# Altium PCB PCB_Control_Unit_2027.PcbDoc
Units mil, origin at the board's own origin, x right, y up, seen from the top; angles counter-clockwise.
Board outline 6000 x 6985 mil, 2 copper layers (Top Layer, Bottom Layer); 48 components, 53 nets, 325 pads, 0 vias.
Unrouted connection lines stored in the file: 91.
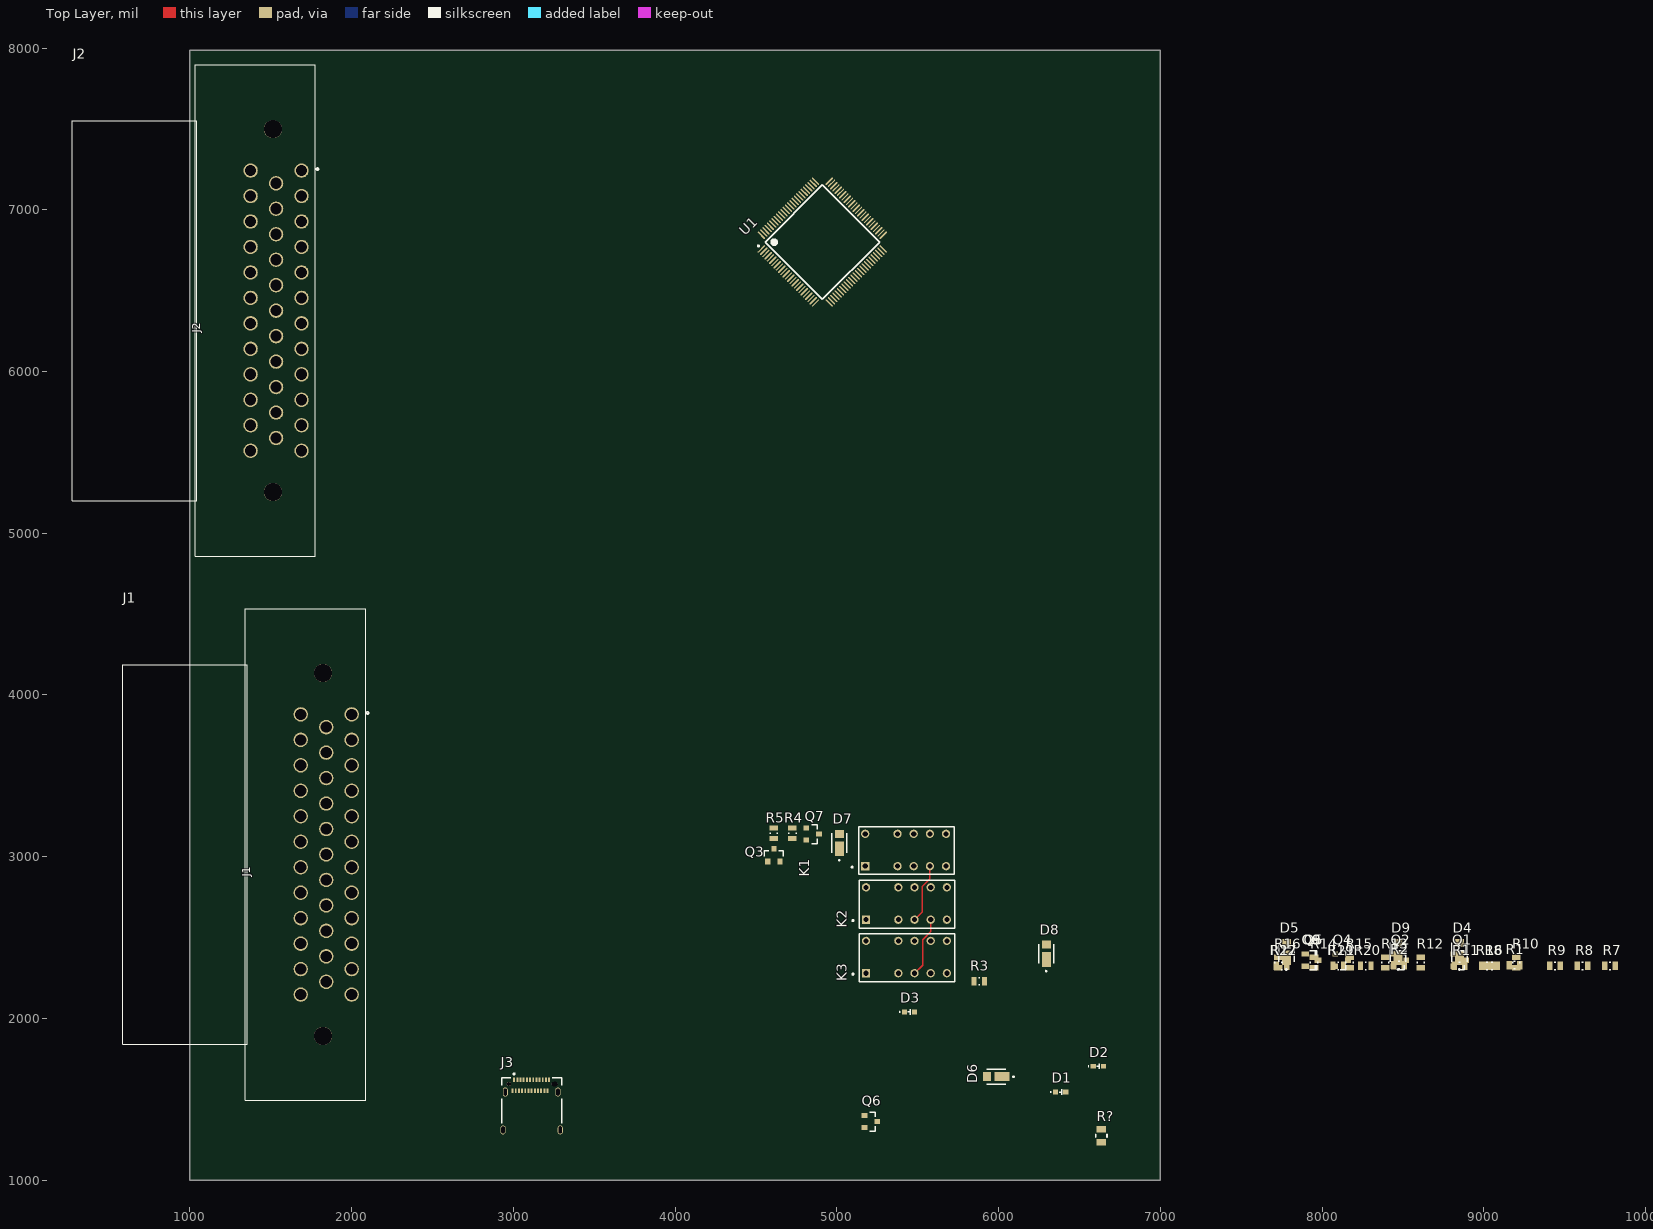
[diagram p0: Top Layer view]
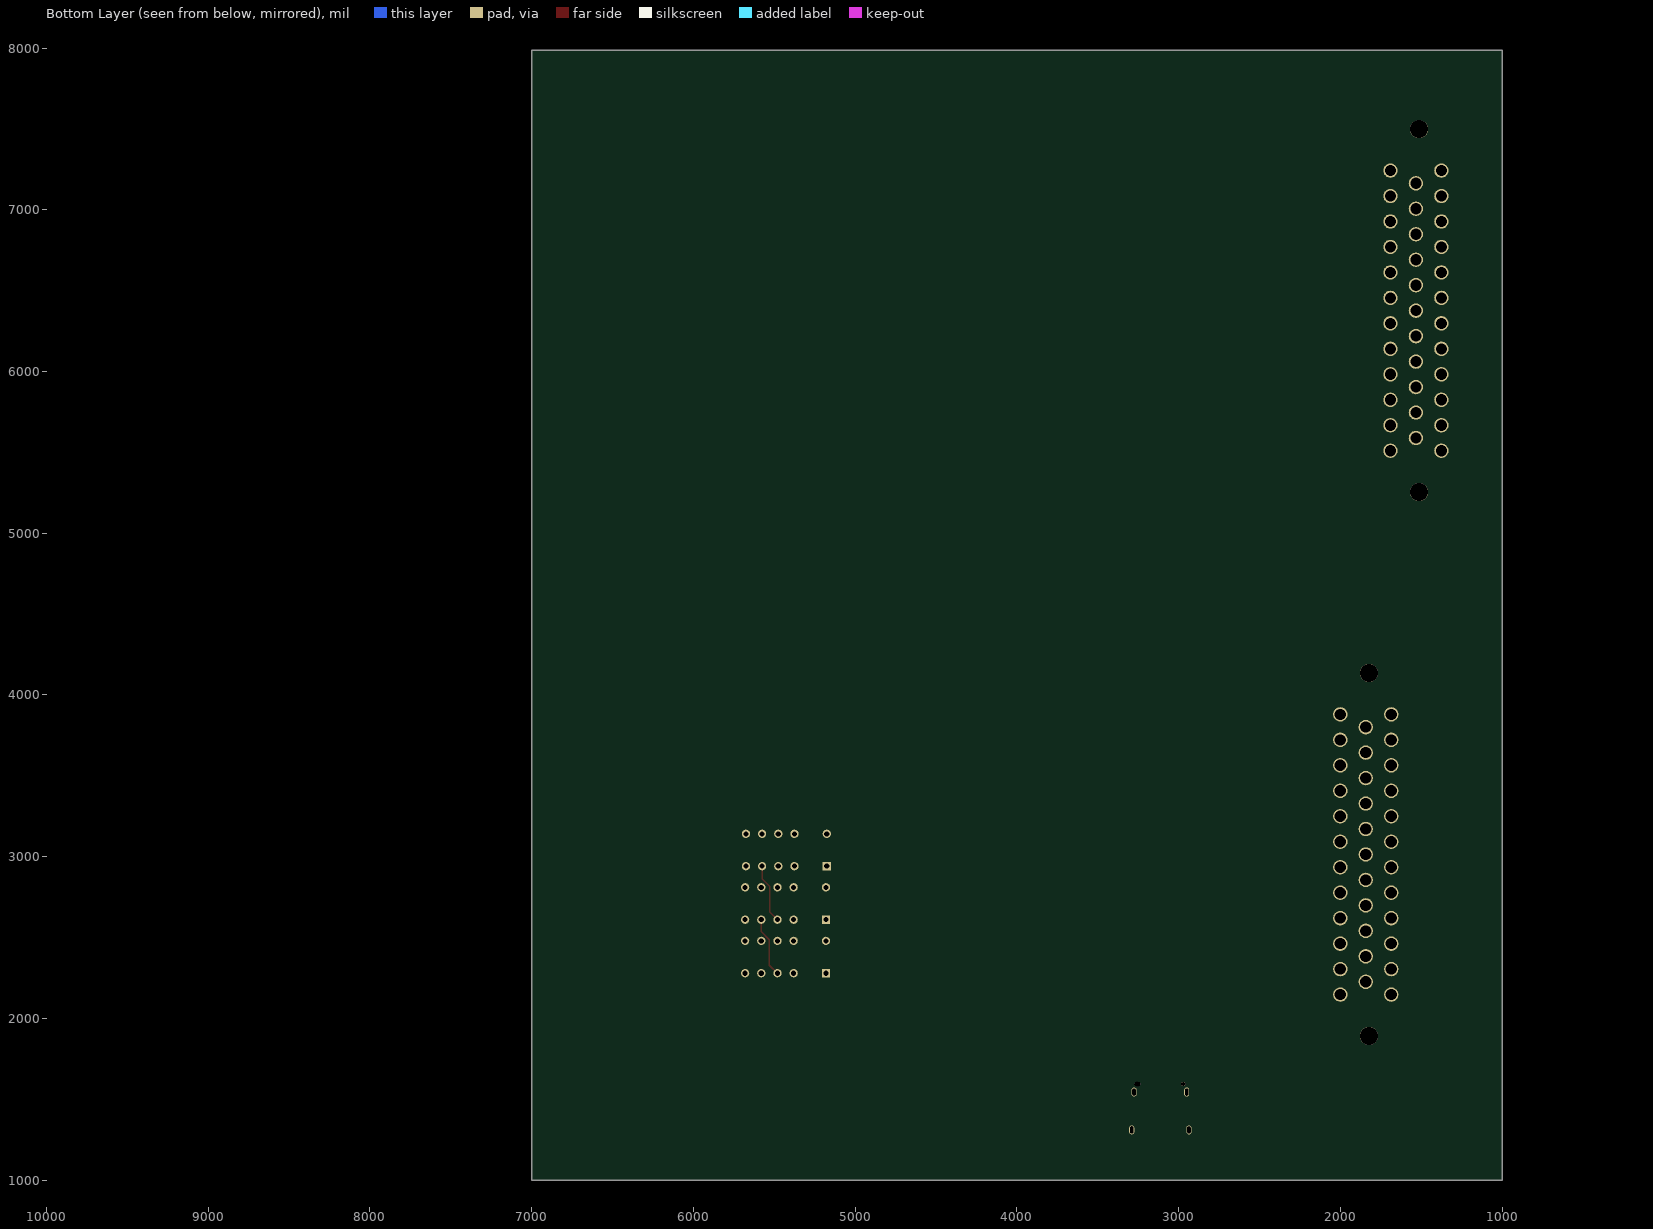
[diagram p1: Bottom Layer view, seen from below]

## Layer stack, top to bottom
Top Solder: solder mask 0.4, Solder Resist, Dk 3.5
Top Layer: signal copper 1.4
Dielectric 1: dielectric 12.6, FR-4, Dk 4.8
Bottom Layer: signal copper 1.4
Bottom Solder: solder mask 0.4, Solder Resist, Dk 3.5

## Board outline
1000,1000 7000,1000 7000,7985 1000,7985

## Design rules (kind name [scope] priority, off if disabled: settings)
Clearance [All] p1: gap=10 ignorepadtopadclearanceinfootprint=FALSE
PolygonConnect [All] p1: connectstyle=Relief reliefconductorwidth=10 reliefentries=4 polygonreliefangle="90 Angle" airgapwidth=10
RoutingVias [All] p1: holewidth=28 width=50 viastyle="Through Hole" minholewidth=28 minwidth=50 maxholewidth=28 maxwidth=50
SolderMaskExpansion [All] p1: expansion=0 istentingtop=FALSE
SupplyNets "Schematic Supply Nets" [InNet('GND')] p1: voltage=0.000
Width [All] p1: maxlimit=10 minlimit=10 preferedwidth=10
30 further rules are at their usual default settings.

## Classes and differential pairs
component class "Latching Relays": D1 D2 D3 D4 D5 D6 D7 D8 D9 K1 K2 K3 Q1 Q2 Q3 Q4 Q5 Q6 Q7 Q8 Q9 R1 R2 R3 R4 R5 R6 R7 R8 R9 R10 R11 R12 R13 R14 R15 R16 R17 R18 R19 R20 R21 R22 R?
component class "Software Interface and CAN": J3 U1
component class "Connectors and Vehicle Interfacing": J1 J2

## Components (designator, comment, footprint, x,y, rotation, side; value= is the part's Value field where it differs from the comment)
D1 "150060SS55040" WL-SMCD_0603 56383.5,51545 r0 top
D2 "150060SS55040" WL-SMCD_0603 56616.5,51705 r0 top
D3 "150060SS55040" WL-SMCD_0603 55448.5,52040 r0 top
D4 "SS14FP" FP-425AC-MFG 8850,2410 r90 top
D5 "SS14FP" FP-425AC-MFG 7780,2410 r90 top
D6 "SS14FP" FP-425AC-MFG 5985,1640 r180 top
D7 "SS14FP" FP-425AC-MFG 5015,3085 r90 top
D8 "SS14FP" FP-425AC-MFG 6295,2400 r90 top
D9 "SS14FP" FP-425AC-MFG 8470,2410 r90 top
J1 "1-776180-1" CONN35_776180_TEC 1999.96,3879.88 r90 top
J2 "1-776180-1" CONN35_776180_TEC 1689.96,7242.28 r90 top
J3 "12401610E4#2A" FP-12401610E4#2A-MFG 3112.6,1422.36 r0 top
K1 "EC2-12TNU" FP-EC2-12TNU-MFG 5428.94,3037.58 r180 top
K2 "EC2-12TNU" FP-EC2-12TNU-MFG 5433.94,2706.56 r180 top
K3 "EC2-12TNU" FP-EC2-12TNU-MFG 5433.94,2375.53 r180 top
Q1 "2N7002-7-F" FP-SOT23-MFG 8850,2360 r0 top
Q2 "2N7002-7-F" FP-SOT23-MFG 8480,2360 r0 top
Q3 "2N7002-7-F" FP-SOT23-MFG 4610,3010 r90 top
Q4 "2N7002-7-F" FP-SOT23-MFG 8120,2360 r0 top
Q5 "2N7002-7-F" FP-SOT23-MFG 7940,2360 r0 top
Q6 "2N7002-7-F" FP-SOT23-MFG 5209.37,1362.4 r0 top
Q7 "2N7002-7-F" FP-SOT23-MFG 4850,3140 r0 top
Q8 "2N7002-7-F" FP-SOT23-MFG 7930,2360 r0 top
Q9 "2N7002-7-F" FP-SOT23-MFG 7930,2360 r0 top
R1 "560" RESC2013X50X30LL20T20 9190,2330 r0 top
R2 "CRCW08052R80FNEA" RESC2013X50X30LL20T20 8475,2330 r0 top
R3 "CRCW08052R80FNEA" RESC2013X50X30LL20T20 5880.13,2229.5 r0 top
R4 "CRCW08052R80FNEA" RESC2013X50X30LL20T20 4725,3145 r90 top
R5 "CRCW08052R80FNEA" RESC2013X50X30LL20T20 4610,3145 r90 top
R6 "1K" RESC2013X50X30LL20T20 9050,2325 r0 top
R7 "10K" RESC2013X50X30LL20T20 9780,2325 r0 top
R8 "1K" RESC2013X50X30LL20T20 9610,2325 r0 top
R9 "10K" RESC2013X50X30LL20T20 9440,2325 r0 top
R10 "10K" RESC2013X50X30LL20T20 9200,2345 r90 top
R11 "CRCW08052R80FNEA" RESC2013X50X30LL20T20 8850,2325 r0 top
R12 "CRCW08052R80FNEA" RESC2013X50X30LL20T20 8610,2345 r90 top
R13 "CRCW08052R80FNEA" RESC2013X50X30LL20T20 8390,2345 r90 top
R14 "CRCW08052R80FNEA" RESC2013X50X30LL20T20 7950,2345 r90 top
R15 "CRCW08052R80FNEA" RESC2013X50X30LL20T20 8170,2345 r90 top
R16 "CRCW08052R80FNEA" RESC2013X50X30LL20T20 7730,2345 r90 top
R17 "10K" RESC2013X50X30LL20T20 7750,2325 r0 top
R18 "1K" RESC2013X50X30LL20T20 9020,2325 r0 top
R19 "1K" RESC2013X50X30LL20T20 8100,2325 r0 top
R20 "10K" RESC2013X50X30LL20T20 8270,2325 r0 top
R21 "1K" RESC2013X50X30LL20T20 8100,2325 r0 top
R22 "10K" RESC2013X50X30LL20T20 7750,2325 r0 top
R? "1" SMD-0805-RES 6635,1275 r0 top
U1 "STM32F446VCT6" STM-LQFP100_L 4910,6800 r45 top

## Footprints (in the part's own frame and the unit in brackets; to place one, negate y for a bottom-side part, rotate by r counter-clockwise, add the part's x,y. Pads: shape width x height; smd on the part's side, far side on the other; paste and mask are expansions set on the pad)
CONN35_776180_TEC [mil]
  round 89 hole 69 paste-99999 mask+0: 1(0,0) 2(-157.48,0) 3(-314.96,0) 4(-472.44,0) 5(-629.92,0) 6(-787.4,0) 7(-944.88,0) 8(-1102.36,0) 9(-1259.84,0) 10(-1417.32,0) 11(-1574.8,0) 12(-1732.28,0) 13(-78.74,157.48) 14(-236.22,157.48) 15(-393.7,157.48) 16(-551.18,157.48) 17(-708.66,157.48) 18(-866.14,157.48) 19(-1023.62,157.48) 20(-1181.1,157.48) 21(-1338.58,157.48) 22(-1496.06,157.48) 23(-1653.54,157.48) 24(0,314.96) 25(-157.48,314.96) 26(-314.96,314.96) 27(-472.44,314.96) 28(-629.92,314.96) 29(-787.4,314.96) 30(-944.88,314.96) 31(-1102.36,314.96) 32(-1259.84,314.96) 33(-1417.32,314.96) 34(-1574.8,314.96) 35(-1732.28,314.96)
  round 112 hole 112 unplated paste-99999 mask+0: 36(-1988.19,177.16) 37(255.91,177.16)
  silkscreen extent -2385,-105 653,1417, body extent -2379,-80 649,1408, height 1282
FP-425AC-MFG [mm]
  rect 2.3x1.4 smd paste+0 mask+0: 1(-0.9,0)
  rect 1.25x1.4 smd paste+0 mask+0: 2(1.425,0)
  silkscreen extent -2.82,-1.2 1.5,1.2, body extent -2.15,-1.07 2.15,1.07, height 0.25
FP-12401610E4#2A-MFG [mm]
  rrect100% 0.8x1.4 hole 1.1 slot 0.5 at 0 deg paste-2539.97 mask+0: 1(-4.13,3.115) 2(4.13,3.115) 3(-4.49,-2.835) 4(4.49,-2.835)
  rect 0.3x0.7 smd paste+0 mask+0: A1(-2.75,5.025) A2(-2.25,5.025) A3(-1.75,5.025) A4(-1.25,5.025) A5(-0.75,5.025) A6(-0.25,5.025) A7(0.25,5.025) A8(0.75,5.025) A9(1.25,5.025) A10(1.75,5.025) A11(2.25,5.025) A12(2.75,5.025) B1(2.5,3.325) B2(2,3.325) B3(1.5,3.325) B4(1,3.325) B5(0.5,3.325) B6(0,3.325) B7(-0.5,3.325) B8(-1,3.325) B9(-1.5,3.325) B10(-2,3.325) B11(-2.5,3.325) B12(-3,3.325)
  round 0.65 hole 0.65 unplated paste-2539.97 mask+0: ""(-3.6,4.365)
  rrect100% 0.95x0.65 hole 0.65 slot 0.95 at 0 deg unplated paste-2539.97 mask+0: ""(3.6,4.365)
  silkscreen extent -4.72,-1.76 4.72,6.09, body extent -4.99,-5.45 4.99,5.48, height 0.25
FP-EC2-12TNU-MFG [mm]
  rect 1.3x1.3 hole 0.8 paste-2539.97 mask+0: 1(6.45,2.44)
  round 1.3 hole 0.8 paste-2539.97 mask+0: 3(1.37,2.44) 4(-1.17,2.44) 5(-3.71,2.44) 6(-6.25,2.44) 7(-6.25,-2.64) 8(-3.71,-2.64) 9(-1.17,-2.64) 10(1.37,-2.64) 12(6.45,-2.64)
  silkscreen extent -7.5,-3.75 8.62,3.75, body extent -7.6,-3.85 7.6,3.85, height 0.25
FP-SOT23-MFG [mm]
  rect 0.9x0.8 smd paste+0 mask+0: 1(-1,0.95) 2(-1,-0.95) 3(1,0)
  silkscreen extent -0.18,-1.5 0.7,1.5, body extent -1.55,-1.6 1.55,1.6, height 0.25
RESC2013X50X30LL20T20 [mm] "Chip Resistor, 2-Leads, Body 2.00x1.25mm, IPC High Density"
  rect 0.85x1.35 smd: 1(-0.825,0) 2(0.825,0)
  silkscreen extent -0.1,-0.58 0.1,0.58, body extent -1.1,-0.72 1.1,0.72, height 0.5
SMD-0805-RES [mil]
  rect 60x40 smd: 1(0,40) 2(0,-40)
  silkscreen extent -35,-10 35,10, body extent -24,-39 26,39, height 31
STM-LQFP100_L [mm] "Thin QFP, 100-Leads, Body 14x14mm, Pitch 0.5mm, IPC High Density"
  oval 1.55x0.25 smd: 1(-7.525,6) 2(-7.525,5.5) 3(-7.525,5) 4(-7.525,4.5) 5(-7.525,4) 6(-7.525,3.5) 7(-7.525,3) 8(-7.525,2.5) 9(-7.525,2) 10(-7.525,1.5) 11(-7.525,1) 12(-7.525,0.5) 13(-7.525,0) 14(-7.525,-0.5) 15(-7.525,-1) 16(-7.525,-1.5) 17(-7.525,-2) 18(-7.525,-2.5) 19(-7.525,-3) 20(-7.525,-3.5) 21(-7.525,-4) 22(-7.525,-4.5) 23(-7.525,-5) 24(-7.525,-5.5) 25(-7.525,-6) 51(7.525,-6) 52(7.525,-5.5) 53(7.525,-5) 54(7.525,-4.5) 55(7.525,-4) 56(7.525,-3.5) 57(7.525,-3) 58(7.525,-2.5) 59(7.525,-2) 60(7.525,-1.5) 61(7.525,-1) 62(7.525,-0.5) 63(7.525,0) 64(7.525,0.5) 65(7.525,1) 66(7.525,1.5) 67(7.525,2) 68(7.525,2.5) 69(7.525,3) 70(7.525,3.5) 71(7.525,4) 72(7.525,4.5) 73(7.525,5) 74(7.525,5.5) 75(7.525,6)
  oval 0.25x1.55 smd: 26(-6,-7.525) 27(-5.5,-7.525) 28(-5,-7.525) 29(-4.5,-7.525) 30(-4,-7.525) 31(-3.5,-7.525) 32(-3,-7.525) 33(-2.5,-7.525) 34(-2,-7.525) 35(-1.5,-7.525) 36(-1,-7.525) 37(-0.5,-7.525) 38(0,-7.525) 39(0.5,-7.525) 40(1,-7.525) 41(1.5,-7.525) 42(2,-7.525) 43(2.5,-7.525) 44(3,-7.525) 45(3.5,-7.525) 46(4,-7.525) 47(4.5,-7.525) 48(5,-7.525) 49(5.5,-7.525) 50(6,-7.525) 76(6,7.525) 77(5.5,7.525) 78(5,7.525) 79(4.5,7.525) 80(4,7.525) 81(3.5,7.525) 82(3,7.525) 83(2.5,7.525) 84(2,7.525) 85(1.5,7.525) 86(1,7.525) 87(0.5,7.525) 88(0,7.525) 89(-0.5,7.525) 90(-1,7.525) 91(-1.5,7.525) 92(-2,7.525) 93(-2.5,7.525) 94(-3,7.525) 95(-3.5,7.525) 96(-4,7.525) 97(-4.5,7.525) 98(-5,7.525) 99(-5.5,7.525) 100(-6,7.525)
  silkscreen extent -7.65,-6.35 6.35,6.8, body extent -7,-7 7,7, height 1.6
WL-SMCD_0603 [mm] "SMD Mono-color Chip LED, body 1.6x0.8mm"
  rect 0.8x0.75 smd: 1(-1270.8,-1270) 2(-1269.2,-1270)
  silkscreen extent -1271.62,-1270.4 -1269.78,-1269.6, body extent -1270.8,-1270.4 -1269.2,-1269.6, height 0.42

## Part data
D1 D2 D3: library part CMP-03913-90235567-2, "150060SS55040 WL-SMCD SMT Mono-color Chip LED Diffused", Forward Current=40mA, Forward Voltage=2V, Max Operating Temperature=85°C, Max Reverse Voltage (DC)=5V, Min Operating Temperature=-40°C, Dominant Wavelength=630nm, Height=400µm, Length=1.6mm, Luminous Intensity=70mcd, NexarPartId=90235567, Packaging="Tape and Reel", Peak Wavelength=645nm, RoHS=Compliant, Viewing Angle=140°, Wavelength=630nm, Width=800µm
D4 D5 D6 D7 D8 D9: library part CMP-00278-84331602-1, "SS14FP Diode Schottky 40V 1A 2-Pin SOD-123HE T/R - Tape and Reel", Average Rectified Current=1A, Capacitance=54pF, Manufacturer Lifecycle Status=ACTIVE, Max Forward Surge Current (Ifsm)=30A, Max Junction Temperature (Tj)=150°C, Max Repetitive Reverse Voltage (Vrrm)=40V, Min Operating Temperature=-55°C, Peak Reverse Current=400µA, Element Configuration=Single, Forward Current=1A, Height=1mm, Lifecycle Status=Production, Max Operating Temperature=150°C, Max Reverse Voltage (DC)=40V, Mount="Surface Mount", NexarPartId=84331602, Reverse Recovery Time=6ns, Reverse Voltage=40V, RoHS=Compliant, Schedule B="8541100080, 8541100080", Weight=18.4mg
J1 J2: "35POS,PIN DIA 1.3,HDR ASSY,90DEG,COD 1", Manufacturer_Name="TE Connectivity", Copyright="Copyright (C) 2026 Ultra Librarian. All rights reserved.", Datasheet=https://www.te.com/commerce/DocumentDelivery/DDEController?Action=srchrtrv&DocNm=1-1773950-7&DocType=Data+Sheet&DocLang=English&PartCntxt=1418882-1&DocFormat=pdf, Manufacturer_Part_Number=1-776180-1, RefDes=RefDes, Type=-
J3: library part CMP-02355-000003-1, "CONN RCP USB3.1 TYPEC 24P SMD RA", Connector Type=USB, Gender=Receptacle, Mount="Surface Mount", Number Of Contacts=24, Number of Pins=24, Packaging="Cut Tape"
K1 K2 K3: library part CMP-03195-000005-1, "RELAY GEN PURPOSE DPDT 2A 12VDC", Ambient Temperature Range High=+85°C, Ambient Temperature Range Low=-40°C, Coil Power=140mW, Coil Resistance=1028Ω, Coil Voltage=12V, Current Rating=2A, Manufacturer=KEMET, Package=0, Switching Power=60W, Automotive=No, Category=Relay, Coil Type="Latching and Dual Coil", ComponentLink2Description=Datasheet, ComponentLink2URL=https://content.kemet.com/datasheets/KEM_R7002_EC2_EE2.pdf, Device Class L1=Electromechanical, Device Class L2=Relays, Device Class L3="Signal Relays", Digikey Description="RELAY GEN PURPOSE DPDT 2A 12VDC", Height=9.4mm, Lead Free=Yes, Manufacturer Part Number=EC2-12TNU, Mouser Description="Relay; E-Mech; Latching; DPDT; Ctrl-V12DC; 2A; 250VAC; PCB Mnt; Thru Hole; EC2/EE2 Series", Number Of Contacts=2, Octopart=https://octopart.com/ec2-12tnu-kemet-30529205, RoHS=TRUE, Switching Current=2A, Throw Configuration=DPDT
Q1 Q2 Q3 Q4 Q5 Q6 Q7 Q8 Q9: library part CMP-2000-04929-2, "MOSFET N-CH 60V 115MA SOT23-3", Case/Package=SOT-23, Continuous Drain Current (ID)=115mA, Drain to Source Breakdown Voltage=70V, Drain to Source Resistance=7.5R, Drain to Source Voltage (Vdss)=60V, Gate to Source Voltage (Vgs)=20V, Input Capacitance=50pF, Max Operating Temperature=150°C, Max Power Dissipation=300mW, Min Operating Temperature=-55°C, Package Quantity=3000, Power Dissipation=540mW, Threshold Voltage=2.5V, Contact Plating=Tin, Current Rating=115mA, Dual Supply Voltage=60V, Element Configuration=Single, Fall Time=5.6ns, Height=1mm, Lead Free="Lead Free", Length=2.9mm, Mount="Surface Mount", Nominal Vgs=2.5V, Number of Channels=1, Number of Elements=1, Number of Pins=3, On-State Resistance=7.5R, Packaging="Tape and Reel", Radiation Hardening=No, Rds On Max=7.5R, REACH SVHC="No SVHC", Rise Time=3ns, Termination=SMD/SMT, Turn-Off Delay Time=11ns, Turn-On Delay Time=7ns, Voltage=60V, Voltage Rating (DC)=60V, Weight=0.000282oz, Width=1.3mm
R1: library part CMP-02407-004922-1, "ERJ-6GEYJ561V / RES SMD 560 OHM 5% 1/8W 0805", Case Code (Imperial)=0805, Case Code (Metric)=2012, Max Operating Temperature=155°C, Max Power Dissipation=125mW, Min Operating Temperature=-55°C, Package Quantity=10, Resistance=2.8R, Temperature Coefficient=200ppm/°C, Tolerance=1%, Voltage Rating=150V, Case/Package=0805, Composition="Thick Film", Contact Plating=Tin, Features="Automotive AEC-Q200", Height=0.02inch, Lead Free="Lead Free", Length=0.079inch, Number of Terminations=2, Packaging="Tape and Reel", Power Rating=125mW, Radiation Hardening=No, Termination=SMD/SMT, Voltage Rating (DC)=150V, Weight=0.000194oz, Width=0.049inch
R2 R3 R4 R5 R11 R12 R13 R14 R15 R16: library part CMP-02407-004922-1, "RES Thick Film, 2.8Ω, 1%, 0.125W, 200ppm/°C, 0805", Case Code (Imperial)=0805, Case Code (Metric)=2012, Max Operating Temperature=155°C, Max Power Dissipation=125mW, Min Operating Temperature=-55°C, Package Quantity=10, Resistance=2.8R, Temperature Coefficient=200ppm/°C, Tolerance=1%, Voltage Rating=150V, Case/Package=0805, Composition="Thick Film", Contact Plating=Tin, Features="Automotive AEC-Q200", Height=0.02inch, Lead Free="Lead Free", Length=0.079inch, Number of Terminations=2, Packaging="Tape and Reel", Power Rating=125mW, Radiation Hardening=No, Termination=SMD/SMT, Voltage Rating (DC)=150V, Weight=0.000194oz, Width=0.049inch
R6 R8 R18 R19 R21: library part CMP-02407-004922-1, "ERJ-P06J102V / RES SMD 1K OHM 5% 1/2W 0805", Case Code (Imperial)=0805, Case Code (Metric)=2012, Max Operating Temperature=155°C, Max Power Dissipation=125mW, Min Operating Temperature=-55°C, Package Quantity=10, Resistance=2.8R, Temperature Coefficient=200ppm/°C, Tolerance=1%, Voltage Rating=150V, Case/Package=0805, Composition="Thick Film", Contact Plating=Tin, Features="Automotive AEC-Q200", Height=0.02inch, Lead Free="Lead Free", Length=0.079inch, Number of Terminations=2, Packaging="Tape and Reel", Power Rating=125mW, Radiation Hardening=No, Termination=SMD/SMT, Voltage Rating (DC)=150V, Weight=0.000194oz, Width=0.049inch
R7 R9 R10 R17 R20 R22: library part CMP-02407-004922-1, "ERA-6AEB103V / RES SMD 10K OHM 0.1% 1/8W 0805", Case Code (Imperial)=0805, Case Code (Metric)=2012, Max Operating Temperature=155°C, Max Power Dissipation=125mW, Min Operating Temperature=-55°C, Package Quantity=10, Resistance=2.8R, Temperature Coefficient=200ppm/°C, Tolerance=1%, Voltage Rating=150V, Case/Package=0805, Composition="Thick Film", Contact Plating=Tin, Features="Automotive AEC-Q200", Height=0.02inch, Lead Free="Lead Free", Length=0.079inch, Number of Terminations=2, Packaging="Tape and Reel", Power Rating=125mW, Radiation Hardening=No, Termination=SMD/SMT, Voltage Rating (DC)=150V, Weight=0.000194oz, Width=0.049inch
R?: library part ERJ-6BQF1R0V, "RES SMD 1 OHM 1% 1/3W 0805", Digi-Key Part Number=P17499CT-ND, Manufacturer="Panasonic Electronic Components", Operating Temperature="-55°C ~ 125°C", Package / Case="0805 (2012 Metric)", Power (Watts)="0.333W, 1/3W", Supplier Device Package=0805, Temperature Coefficient=±200ppm/°C, Tolerance=±1%, @ qty=1500, Composition="Thick Film", Datasheets=https://industrial.panasonic.com/cdbs/www-data/pdf/RDA0000/AOA0000C239.pdf, Factory Stock=0, Failure Rate=-, Features="Automotive AEC-Q200, Current Sense", Height - Seated (Max)="0.028\" (0.70mm)", Image=//media.digikey.com/Renders/Panasonic%20Renders/ERJ-0805%20Pkg.jpg, Minimum Quantity=1, Number of Terminations=2, Packaging="Cut Tape (CT)", Part Number=ERJ-6BQF1R0V, Part Status=Active, Quantity Available=808, Series=ERJ, Size / Dimension="0.079\" L x 0.049\" W (2.00mm x 1.25mm)", Unit Price (USD)=0.05834
U1: library part CMP-0243-00219-1, "ARM Cortex-M4 32-bit MCU+FPU, 256 KB Flash, 128 KB Internal RAM, 81 I/Os, 100-Pin LQFP, -40 to 85 degC, Tray", I/Os (High Current)=81, Operating Frequency(F) (Processor speed) (MHz)=180, Package Description=LQFP100, Package Reference="100-Pin Low Profile Quad Flat Package, Body 14 x 14 mm, Pitch 0.5 mm", Supply Voltage(Vcc) min (V)=1.7, ComponentLink1Description="Manufacturer URL", ComponentLink1URL=http://www.st.com/, ComponentLink2Description=Datasheet, ComponentLink2URL=http://www.st.com/st-web-ui/static/active/en/resource/technical/document/datasheet/DM00141306.pdf, Core="ARM Cortex-M4", D/A Converter=2, DatasheetVersion="Rev. 6", FLASH Size (Prog) (kB)=256, Internal RAM Size (kB)=128, Mounting Technology="Surface Mount", Packing=Tray

## Nets (pads, with @x,y where several pads share a name; then routed paths per layer and width w, separated by ;. In a path a pad name is that pad's centre, name@x,y a point inside that pad or via, vN(x,y) a via of type N, cw(c..) or ccw(c..) an arc to the next point about the centre after c; other vN are vias at no path point)
"AMS Err Pin": D7.2 K1.12 Q7.3
"AMS OK": Q3.3 R5.1 R7.2 R8.1
"AMS Rst Pin": D4.2 K1.7 Q2.3
"BSPD Err Pin": D9.2 K3.12 Q9.3
"BSPD Rst Pin": D8.2 K3.7 Q1.3
GND: K1.8 K2.8 K3.8 Q3.2 Q5.2 Q6.2 Q7.2 Q8.2 Q9.2 R3.1 R10.2 R14.1 R22.1
"IMD Err Pin": D6.2 K2.12 Q6.3
"IMD Rst Pin": D5.2 K2.7 Q4.3 R2.2
"Latching Delayed": D4.1 D5.1 D6.1 D7.1 D8.1 D9.1 K1.1 K1.6 K2.1 K2.6 K3.1 K3.6 R1.2 R4.1 R7.1 R9.1 R11.2 R12.1 R16.2 R17.2 R20.2
NetD1_1: D1.1 K1.10
NetD1_2: D1.2 R1.1
NetD2_1: D2.1 K2.10
NetD2_2: D2.2 R11.1
NetD3_1: D3.1 K3.10
NetD3_2: D3.2 R16.1
NetJ1_1: J1.1 K1.9
NetJ1_2: J1.2 K2.9
NetJ1_3: J1.3 K3.9
NetJ1_4: J1.4
NetJ1_5: J1.5 J1.6 J1.7 J1.8 J1.9 J1.10 J1.11 J1.18
NetJ1_12: J1.12
NetJ1_13: J1.13
NetJ1_14: J1.14
NetJ1_15: J1.15
NetJ1_16: J1.16
NetJ1_17: J1.17
NetJ1_19: J1.19 J1.20 J1.21 J1.22 J1.23 J1.29 J1.30 J1.31 J1.32 J1.33
NetJ1_24: J1.24
NetJ1_25: J1.25
NetJ1_26: J1.26
NetJ1_27: J1.27
NetJ1_28: J1.28
NetJ1_34: J1.34
NetJ1_35: J1.35
NetK1_4: K1.4
NetK3_5: K3.5
NetQ1_1: Q1.1 R19.2
NetQ1_2: Q1.2 Q2.2 Q4.1 R10.1 R22.2
NetQ2_1: Q2.1 R8.2
NetQ3_1: Q3.1 R6.2 R9.2
NetQ4_2: Q4.2 R3.2
NetQ5_1: Q5.1 R15.2
NetQ5_3: Q5.3 R12.2 R13.1
NetQ6_1: Q6.1 R13.2
NetQ7_1: Q7.1 R4.2 R5.2
NetQ8_1: Q8.1 R18.2
NetQ8_3: Q8.3 R17.1 R19.1
NetQ9_1: Q9.1 R20.1 R21.2
NetR2_1: R2.1 R14.2 R15.1
NetR6_1: R6.1
NetR18_1: R18.1 R21.1
"SCHT AMS to IMD": K1.5 K2.4 | length 370.4
  Top Layer w10: K2.4 5527.5,2657.99 5527.5,2815.4 5575,2862.9 K1.5
"SCHT IMD to BSPD": K2.5 K3.4 | length 372.4
  Top Layer w10: K3.4 5530,2329.47 5530,2486.87 5580,2536.87 K2.5
pads on no net: J1.36 J1.37 J2.1 J2.2 J2.3 J2.4 J2.5 J2.6 J2.7 J2.8 J2.9 J2.10 J2.11 J2.12 J2.13 J2.14 J2.15 J2.16 J2.17 J2.18 J2.19 J2.20 J2.21 J2.22 J2.23 J2.24 J2.25 J2.26 J2.27 J2.28 J2.29 J2.30 J2.31 J2.32 J2.33 J2.34 J2.35 J2.36 J2.37 J3. J3.1 J3.2 J3.3 J3.4 J3.A1 J3.A2 J3.A3 J3.A4 J3.A5 J3.A6 J3.A7 J3.A8 J3.A9 J3.A10 J3.A11 J3.A12 J3.B1 J3.B2 J3.B3 J3.B4 J3.B5 J3.B6 J3.B7 J3.B8 J3.B9 J3.B10 J3.B11 J3.B12 K1.3 K2.3 K3.3 R?.1 R?.2 U1.1 U1.2 U1.3 U1.4 U1.5 U1.6 U1.7 U1.8 U1.9 U1.10 U1.11 U1.12 U1.13 U1.14 U1.15 U1.16 U1.17 U1.18 U1.19 U1.20 U1.21 U1.22 U1.23 U1.24 U1.25 U1.26 U1.27 U1.28 U1.29 U1.30 U1.31 U1.32 U1.33 U1.34 U1.35 U1.36 U1.37 U1.38 U1.39 U1.40 U1.41 U1.42 U1.43 U1.44 U1.45 U1.46 U1.47 U1.48 U1.49 U1.50 U1.51 U1.52 U1.53 U1.54 U1.55 U1.56 U1.57 U1.58 U1.59 U1.60 U1.61 U1.62 U1.63 U1.64 U1.65 U1.66 U1.67 U1.68 U1.69 U1.70 U1.71 U1.72 U1.73 U1.74 U1.75 U1.76 U1.77 U1.78 U1.79 U1.80 U1.81 U1.82 U1.83 U1.84 U1.85 U1.86 U1.87 U1.88 U1.89 U1.90 U1.91 U1.92 U1.93 U1.94 U1.95 U1.96 U1.97 U1.98 U1.99 U1.100

## Text inside footprints (layer, text, board x,y; h text height)
J1: Mechanical 13 "35" at 1673.39,2038.74 h50 r90; Mechanical 13 "24" at 1673.39,3938.74 h50 r90; Mechanical 13 "12" at 1998.39,2038.74 h50 r90; Mechanical 13 "1" at 1998.39,3951.24 h50 r90
J2: Mechanical 13 "35" at 1363.39,5401.14 h50 r90; Mechanical 13 "24" at 1363.39,7301.14 h50 r90; Mechanical 13 "12" at 1688.39,5401.14 h50 r90; Mechanical 13 "1" at 1688.39,7313.64 h50 r90